# Altium PCB pcb_altium.pcbdoc
Units mil, origin at the board's own origin, x right, y up, seen from the top; angles counter-clockwise.
Board outline 3710 x 3110 mil, 2 copper layers (Top Layer, Bottom Layer); 9 components, 13 nets, 57 pads, 12 vias.
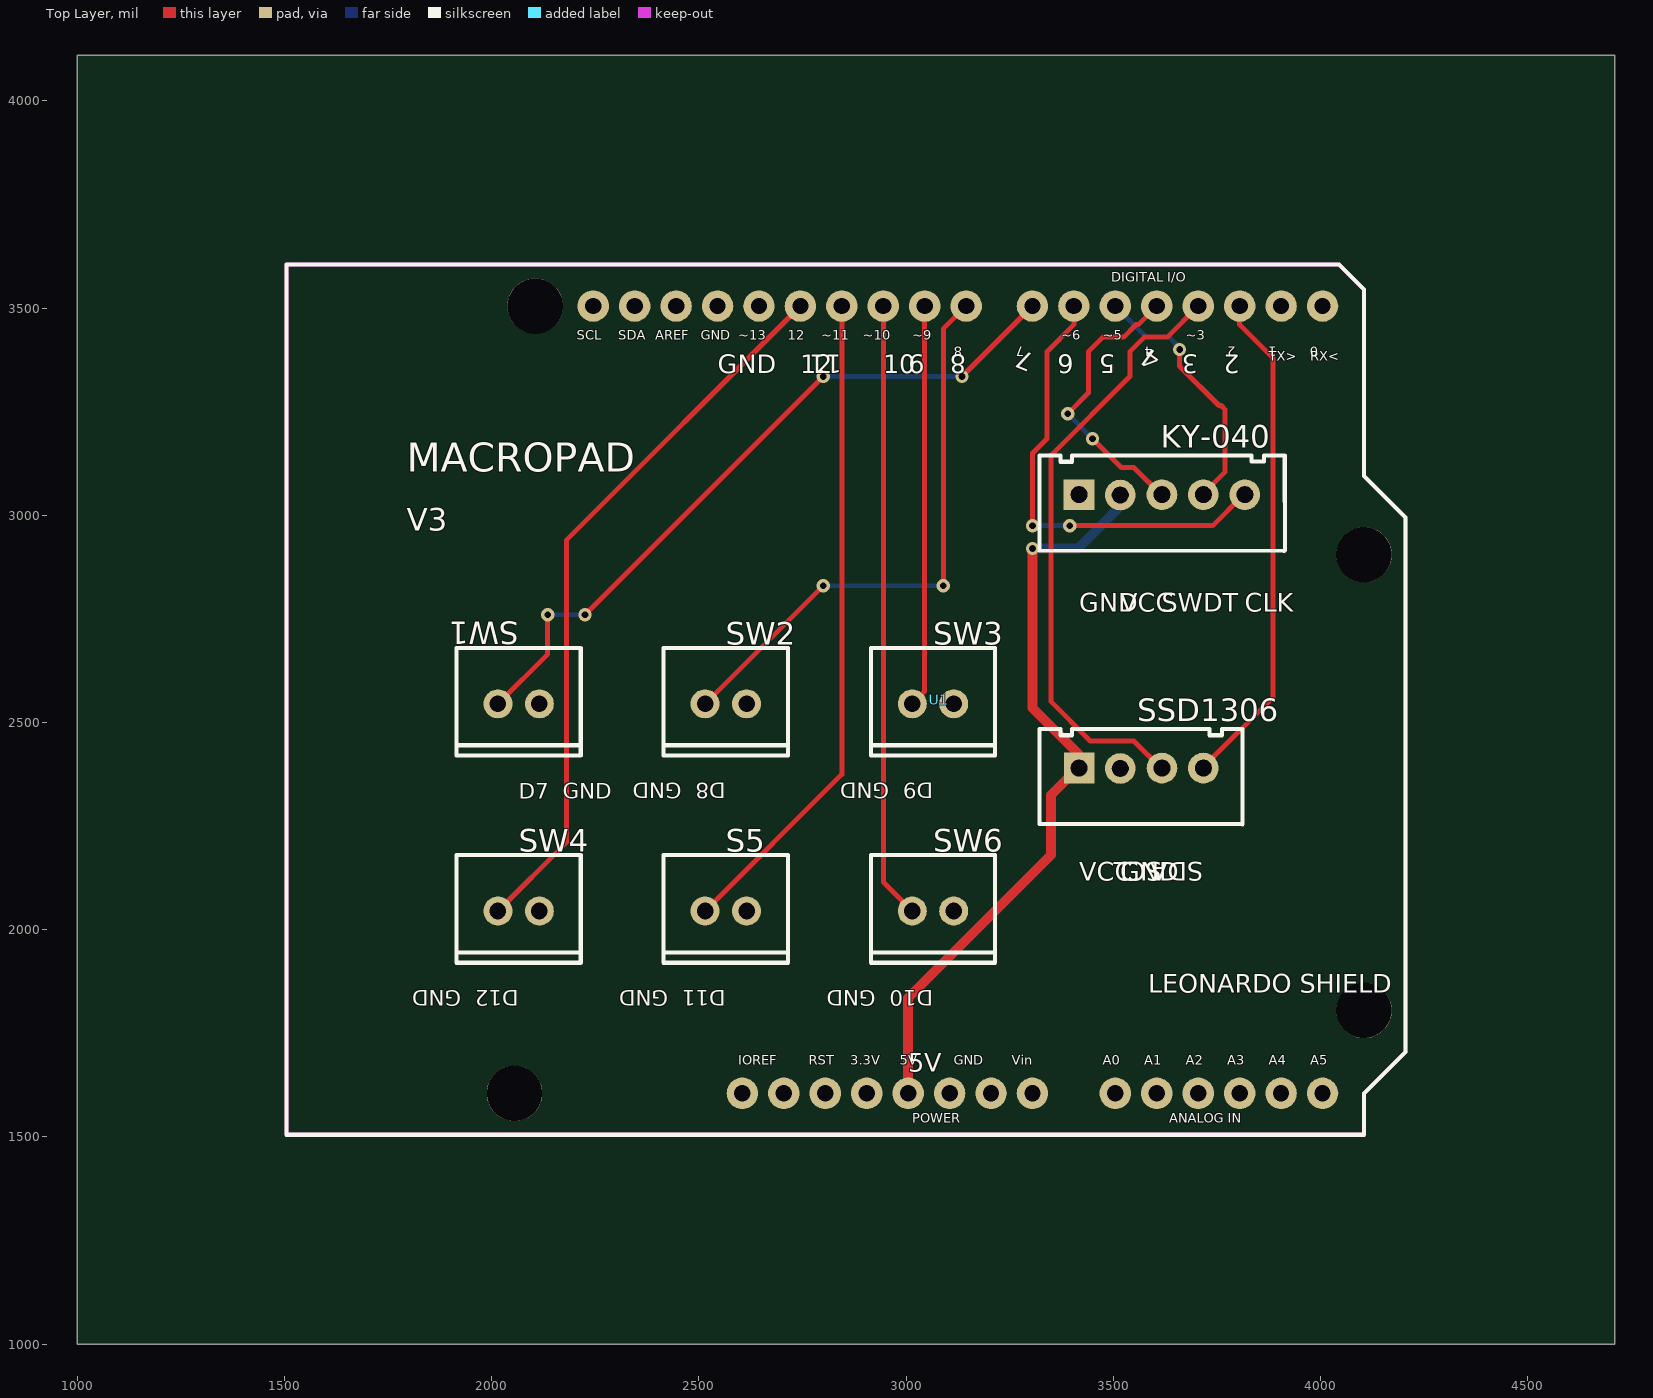
[diagram p0: Top Layer view]
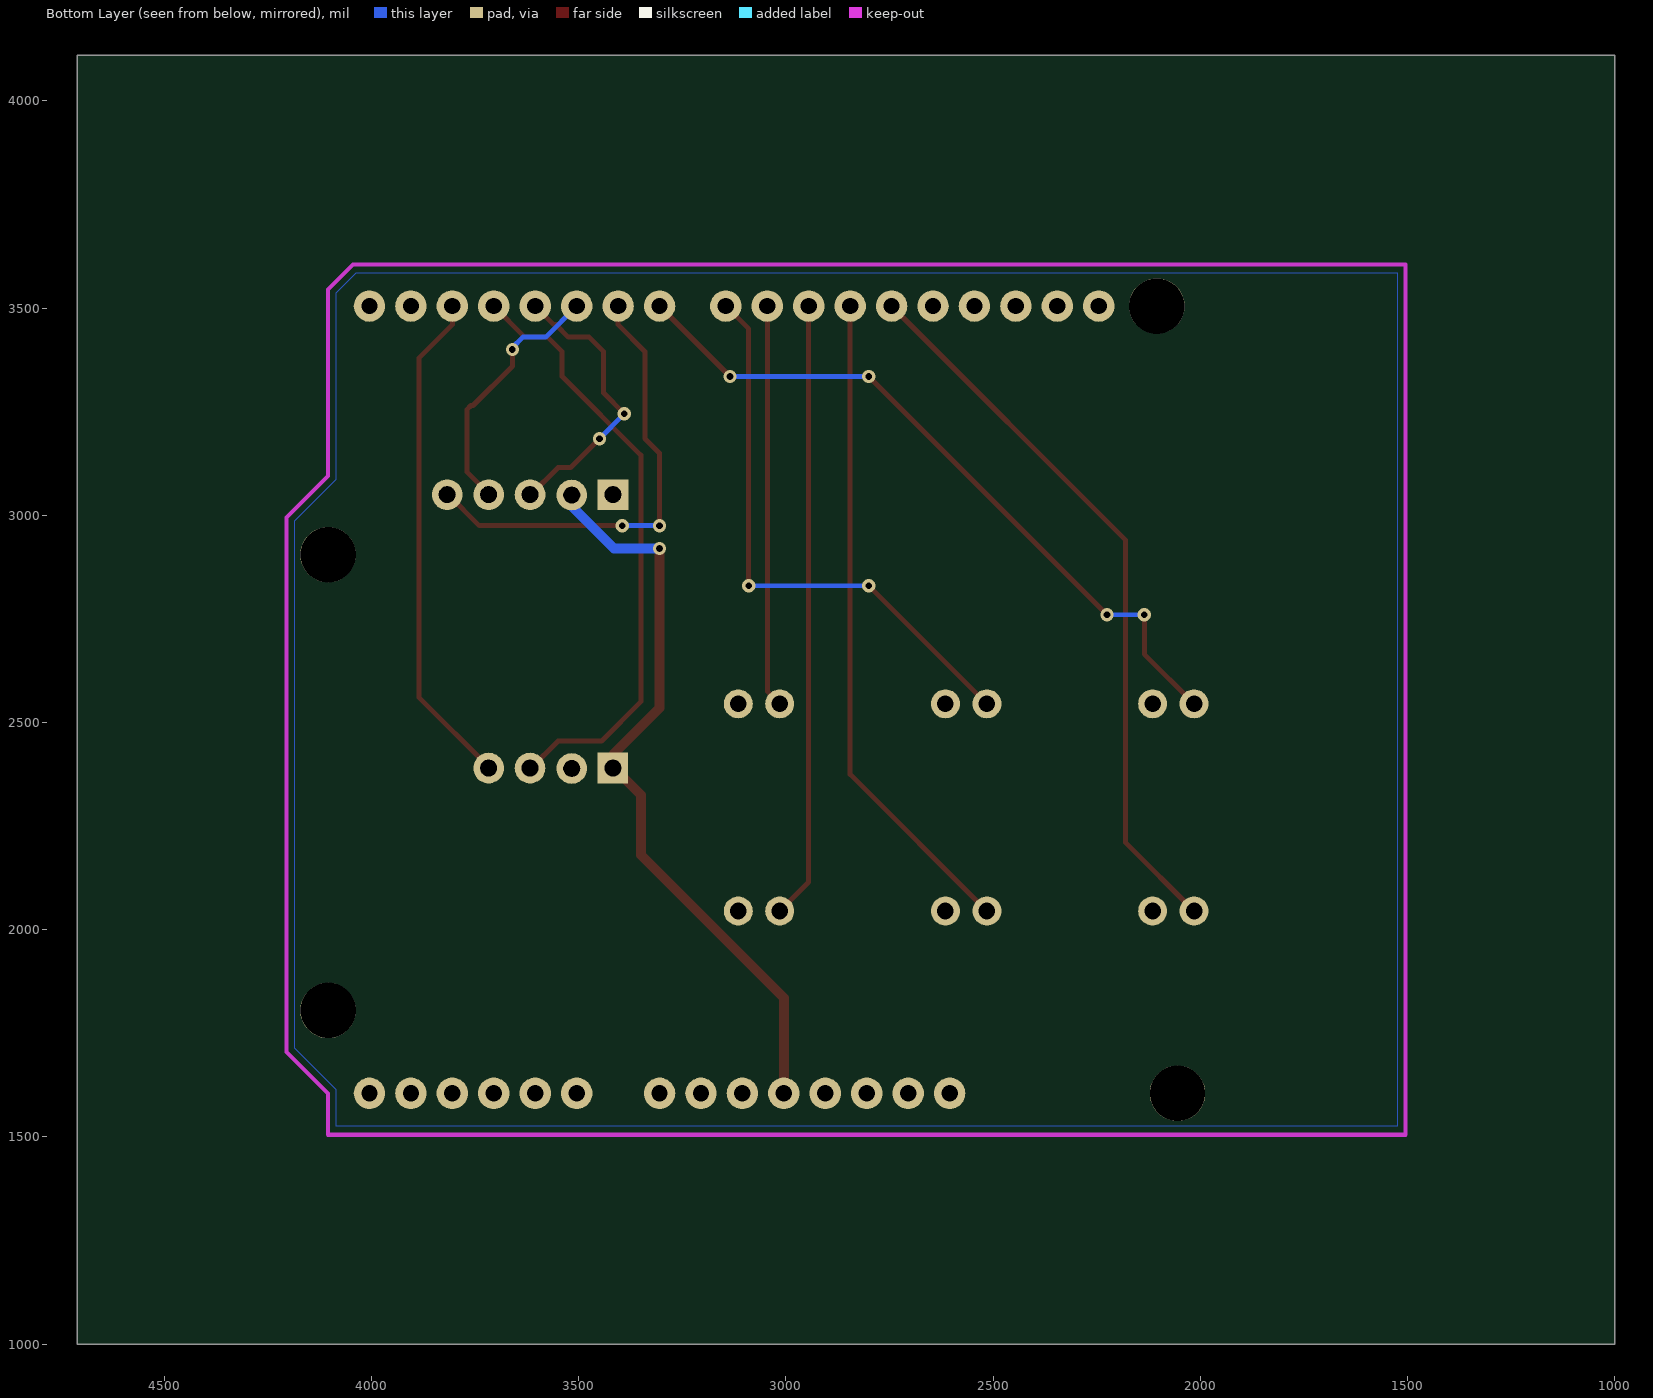
[diagram p1: Bottom Layer view, seen from below]

## Layer stack, top to bottom
Top Layer: signal copper (thickness not stored)
Dielectric: dielectric 12.6, FR-4, Dk 4.8
Bottom Layer: signal copper (thickness not stored)

## Board outline
4710,1000 1000,1000 1000,4110 4710,4110

## Components (designator, comment, footprint, x,y, rotation, side; value= is the part's Value field where it differs from the comment)
KY-040 "JSTXH-1X5" JSTXH-1X5 3455,3040 r0 top
S5 "1x2 JST XH" "1X2 JST XH" 2565,1945 r0 top
SSD1306 "JSTXH-1X4" JSTXH-1X4 3457.5,2380 r0 top
SW1 "1x2 JST XH" "1X2 JST XH" 2065,2445 r0 top
SW2 "1x2 JST XH" "1X2 JST XH" 2565,2445 r0 top
SW3 "1x2 JST XH" "1X2 JST XH" 3065,2445 r0 top
SW4 "1x2 JST XH" "1X2 JST XH" 2065,1945 r0 top
SW6 "1x2 JST XH" "1X2 JST XH" 3065,1945 r0 top
U1 "Arduino Leonardo" ARDUINO_LEONARDO 2815,2545 r0 top

## Footprints (in the part's own frame and the unit in brackets; to place one, negate y for a bottom-side part, rotate by r counter-clockwise, add the part's x,y. Pads: shape width x height; smd on the part's side, far side on the other; paste and mask are expansions set on the pad)
"1X2 JST XH" [mil]
  round 70 hole 40 paste+0 mask+2: 1(50,100) 2(-50,100)
  silkscreen extent -150,-25 150,235
ARDUINO_LEONARDO [mil]
  round 76 hole 39.4 paste+0 mask+2: 3V(90,-940) 5V(190,-940) A0(690,-940) A1(790,-940) A2(890,-940) A3(990,-940) A4(1090,-940) A5(1190,-940) AREF(-370,960) D0(1190,960) D1(1090,960) D2(990,960) D3(890,960) D4(790,960) D5(690,960) D6(590,960) D7(490,960) D8(330,960) D9(230,960) D10(130,960) D11(30,960) D12(-70,960) D13(-170,960) IOREF(-110,-940) RESERVED(-210,-940) RESET(-10,-940) SCL(-570,960) SDA(-470,960) VIN(490,-940)
  round 76 hole 39.4 paste+0 mask+4: GND(-270,960) GND$2(390,-940) GND$3(290,-940)
  round 133.86 hole 133.86 unplated paste+0: ""(-760,-940) ""(-710,960) ""(1290,-740) ""(1290,360)
  silkscreen extent -1310,-1040 1390,1060
JSTXH-1X4 [mil]
  rect 74x74 hole 40 slot 40.2 at 0 deg paste+0 mask+2: 1(-40,10)
  round 74 hole 40 slot 40.2 at 0 deg paste+0 mask+2: 2(59.39,9.02) 3(160,10) 4(260,10)
  silkscreen extent -136,-126 355,104
JSTXH-1X5 [mil]
  rect 74x74 hole 40 slot 40.2 at 0 deg paste+0 mask+2: 1(-37.52,9.85)
  round 74 hole 40 slot 40.2 at 0 deg paste+0 mask+2: 2(61.87,8.87) 3(162.48,9.85) 4(262.48,9.85) 5(362.48,9.85)
  silkscreen extent -133,-126 459,104

## Via types
v1: diameter 32, hole 16, Top Layer to Bottom Layer, tented both sides, 12 vias

## Nets (pads, with @x,y where several pads share a name; then routed paths per layer and width w, separated by ;. In a path a pad name is that pad's centre, name@x,y a point inside that pad or via, vN(x,y) a via of type N, cw(c..) or ccw(c..) an arc to the next point about the centre after c; other vN are vias at no path point)
D2: SSD1306.4 U1.D2 | length 1221.1
  Top Layer w12: SSD1306.4 3715,2390 3885,2560 3885,3380 3805,3460 U1.D2
D3: SSD1306.3 U1.D3 | length 1468
  Top Layer w12: SSD1306.3 3615,2390 3550,2455 3445,2455 3350,2550 3350,3145 3540,3335 3540,3395 3575,3430 3630,3430 U1.D3
D4: KY-040.3 U1.D4 | length 689.5
  Top Layer w12: v1(3390,3245) 3440,3295 3440,3395 3475,3430 3525,3430 3555,3460 3560,3460 U1.D4 ; v1(3450,3185) 3520,3115 3550,3115 3615,3050 KY-040.3
  Bottom Layer w12: v1(3390,3245) v1(3450,3185)
D5: KY-040.4 U1.D5 | length 625.2
  Top Layer w12: v1(3660,3400) 3660,3360 3755,3265 3760,3265 3770,3255 3770,3105 3715,3050 KY-040.4
  Bottom Layer w12: U1.D5 3580,3430 3635,3430 3660,3405 v1(3660,3400)
D6: KY-040.5 U1.D6 | length 1115
  Top Layer w12: v1(3305,2975) 3305,3150 3340,3185 3340,3395 3405,3460 U1.D6 ; v1(3395,2975) 3740,2975 3815,3050 KY-040.5
  Bottom Layer w12: v1(3305,2975) v1(3395,2975)
D7: SW1.2 U1.D7 | length 1743.3
  Top Layer w12: SW1.2 2135,2665 v1(2135,2760) ; v1(2225,2760) v1(2800,3335) ; v1(3135,3335) U1.D7
  Bottom Layer w12: v1(2135,2760) v1(2225,2760) ; v1(2800,3335) v1(3135,3335)
D8: SW2.2 U1.D8 | length 1390.8
  Top Layer w12: SW2.2 v1(2800,2830) ; v1(3090,2830) 3090,3450 U1.D8
  Bottom Layer w12: v1(2800,2830) v1(3090,2830)
D9: SW3.2 U1.D9 | length 972.4
  Top Layer w12: SW3.2 3045,2575 U1.D9
D10: SW6.2 U1.D10 | length 1489
  Top Layer w12: U1.D10 2945,2115 SW6.2
D11: S5.2 U1.D11 | length 1596.7
  Top Layer w12: S5.2 2845,2375 U1.D11
D12: SW4.2 U1.D12 | length 1762.4
  Top Layer w12: SW4.2 2180,2210 2180,2940 U1.D12
GND: KY-040.1 S5.1 SSD1306.2 SW1.1 SW2.1 SW3.1 SW4.1 SW6.1 U1.GND
VCC: KY-040.2 SSD1306.1 U1.5V | length 1817.1
  Top Layer w24: U1.5V 3005,1835 3350,2180 3350,2325 3415,2390 SSD1306.1 3415,2395 3415,2425 3305,2535 v1(3305,2920)
  Bottom Layer w24: v1(3305,2920) 3415,2920 3515,3020 3515,3050 KY-040.2
pads on no net: U1. U1.3V U1.A0 U1.A1 U1.A2 U1.A3 U1.A4 U1.A5 U1.AREF U1.D0 U1.D1 U1.D13 U1.GND$2 U1.GND$3 U1.IOREF U1.RESERVED U1.RESET U1.SCL U1.SDA U1.VIN

## Polygon pours and split planes (outlines as drawn)
GND on Bottom Layer (solid): 1525,1525 4085,1525 4085,1613.28 4185,1713.28 4185,2986.72 4085,3086.72 4085,3536.72 4036.72,3585 1525,3585

## Silkscreen, mask and mechanical layers (free items; w line width, h text height)
Top Overlay:
  text "11" at 2845,3387.5 h45 r180
  text "9" at 3045,3387.5 h45 r180
  text "8" at 3145,3387.5 h45 r180
  text "6" at 3405,3387.5 h45 r180
  text "5" at 3505,3387.5 h45 r180
  text "3" at 3705,3387.5 h45 r180
  text "2" at 3805,3387.5 h45 r180
  text "7" at 3313.43,3385.86 h45 r158
  text "4" at 3618.23,3383.2 h45 r144
  text "GND" at 2545,3342.5 h45
  text "12" at 2745,3342.5 h45
  text "10" at 2945,3342.5 h45
  text "MACROPAD" at 1795,3105 h70
  text "V3" at 1795,2962.5 h55
  text "GND" at 3417.48,2767.5 h45
  text "VCC" at 3516.87,2767.5 h45
  text "SW" at 3617.48,2767.5 h45
  text "DT" at 3717.48,2767.5 h45
  text "CLK" at 3817.48,2767.5 h45
  text "D8  GND" at 2565,2354 h38 r180
  text "D9  GND" at 3065,2354 h38 r180
  text "D7  GND" at 2065,2316 h38
  text "SCL" at 3617.5,2162.5 h45 r180
  text "SDA" at 3717.5,2162.5 h45 r180
  text "VCC" at 3417.5,2117.5 h45
  text "GND" at 3516.89,2117.5 h45
  text "D12  GND" at 2065,1854 h38 r180
  text "D11  GND" at 2565,1854 h38 r180
  text "D10  GND" at 3065,1854 h38 r180
  text "LEONARDO SHIELD" at 3585,1847.5 h45
  text "5V" at 3005,1657.5 h45
Document:
  lines w0.1: 2854.99,2554.99 2855.01,2555.01

## Text inside footprints (layer, text, board x,y; h text height)
U1: Top Overlay "RST" at 2765,1665 h39.37; Top Overlay "3.3V" at 2865,1665 h39.37; Top Overlay "5V" at 2985,1665 h39.37; Top Overlay "GND" at 3115,1665 h39.37; Top Overlay "Vin" at 3255,1665 h39.37; Top Overlay "ANALOG IN" at 3635,1525 h39.37; Top Overlay "A0" at 3475,1665 h39.37; Top Overlay "A1" at 3575,1665 h39.37; Top Overlay "A2" at 3675,1665 h39.37; Top Overlay "A3" at 3775,1665 h39.37; Top Overlay "A4" at 3875,1665 h39.37; Top Overlay "A5" at 3975,1665 h39.37; Top Overlay "AREF" at 2395,3415 h39.37; Top Overlay "GND" at 2505,3415 h39.37; Top Overlay "~13" at 2595,3415 h39.37; Top Overlay "12" at 2715,3415 h39.37; Top Overlay "~11" at 2795,3415 h39.37; Top Overlay "~10" at 2895,3415 h39.37; Top Overlay "~9" at 3015,3415 h39.37; Top Overlay "8" at 3135,3415 h39.37 r180; Top Overlay "7" at 3285,3415 h39.37 r180; Top Overlay "~6" at 3375,3415 h39.37; Top Overlay "~5" at 3475,3415 h39.37; Top Overlay "4" at 3595,3415 h39.37 r180; Top Overlay "~3" at 3675,3415 h39.37; Top Overlay "2" at 3795,3415 h39.37 r180; Top Overlay "1" at 3895,3415 h39.37 r180; Top Overlay "0" at 3995,3415 h39.37 r180; Top Overlay "DIGITAL I/O" at 3495,3555 h39.37; Top Overlay "SCL" at 2205,3415 h39.37; Top Overlay "SDA" at 2305,3415 h39.37; Top Overlay "IOREF" at 2595,1665 h39.37; Top Overlay "TX>" at 3875,3365 h39.37; Top Overlay "RX<" at 3975,3365 h39.37; Top Overlay "POWER" at 3015,1525 h39.37